# Altium PCB NB3000XN.PcbDoc (part 55 of 71)
Units mil, origin at the board's own origin, x right, y up, seen from the top; angles counter-clockwise.
Board outline 9527.56 x 6929.77 mil, 6 copper layers (Top Layer, GND+SHIELD, MidLayer1, MidLayer2, P2 - 3V3+5V0, Bottom Layer), stack 62.375 mil thick; 832 components, 1027 nets, 4655 pads, 4981 vias.
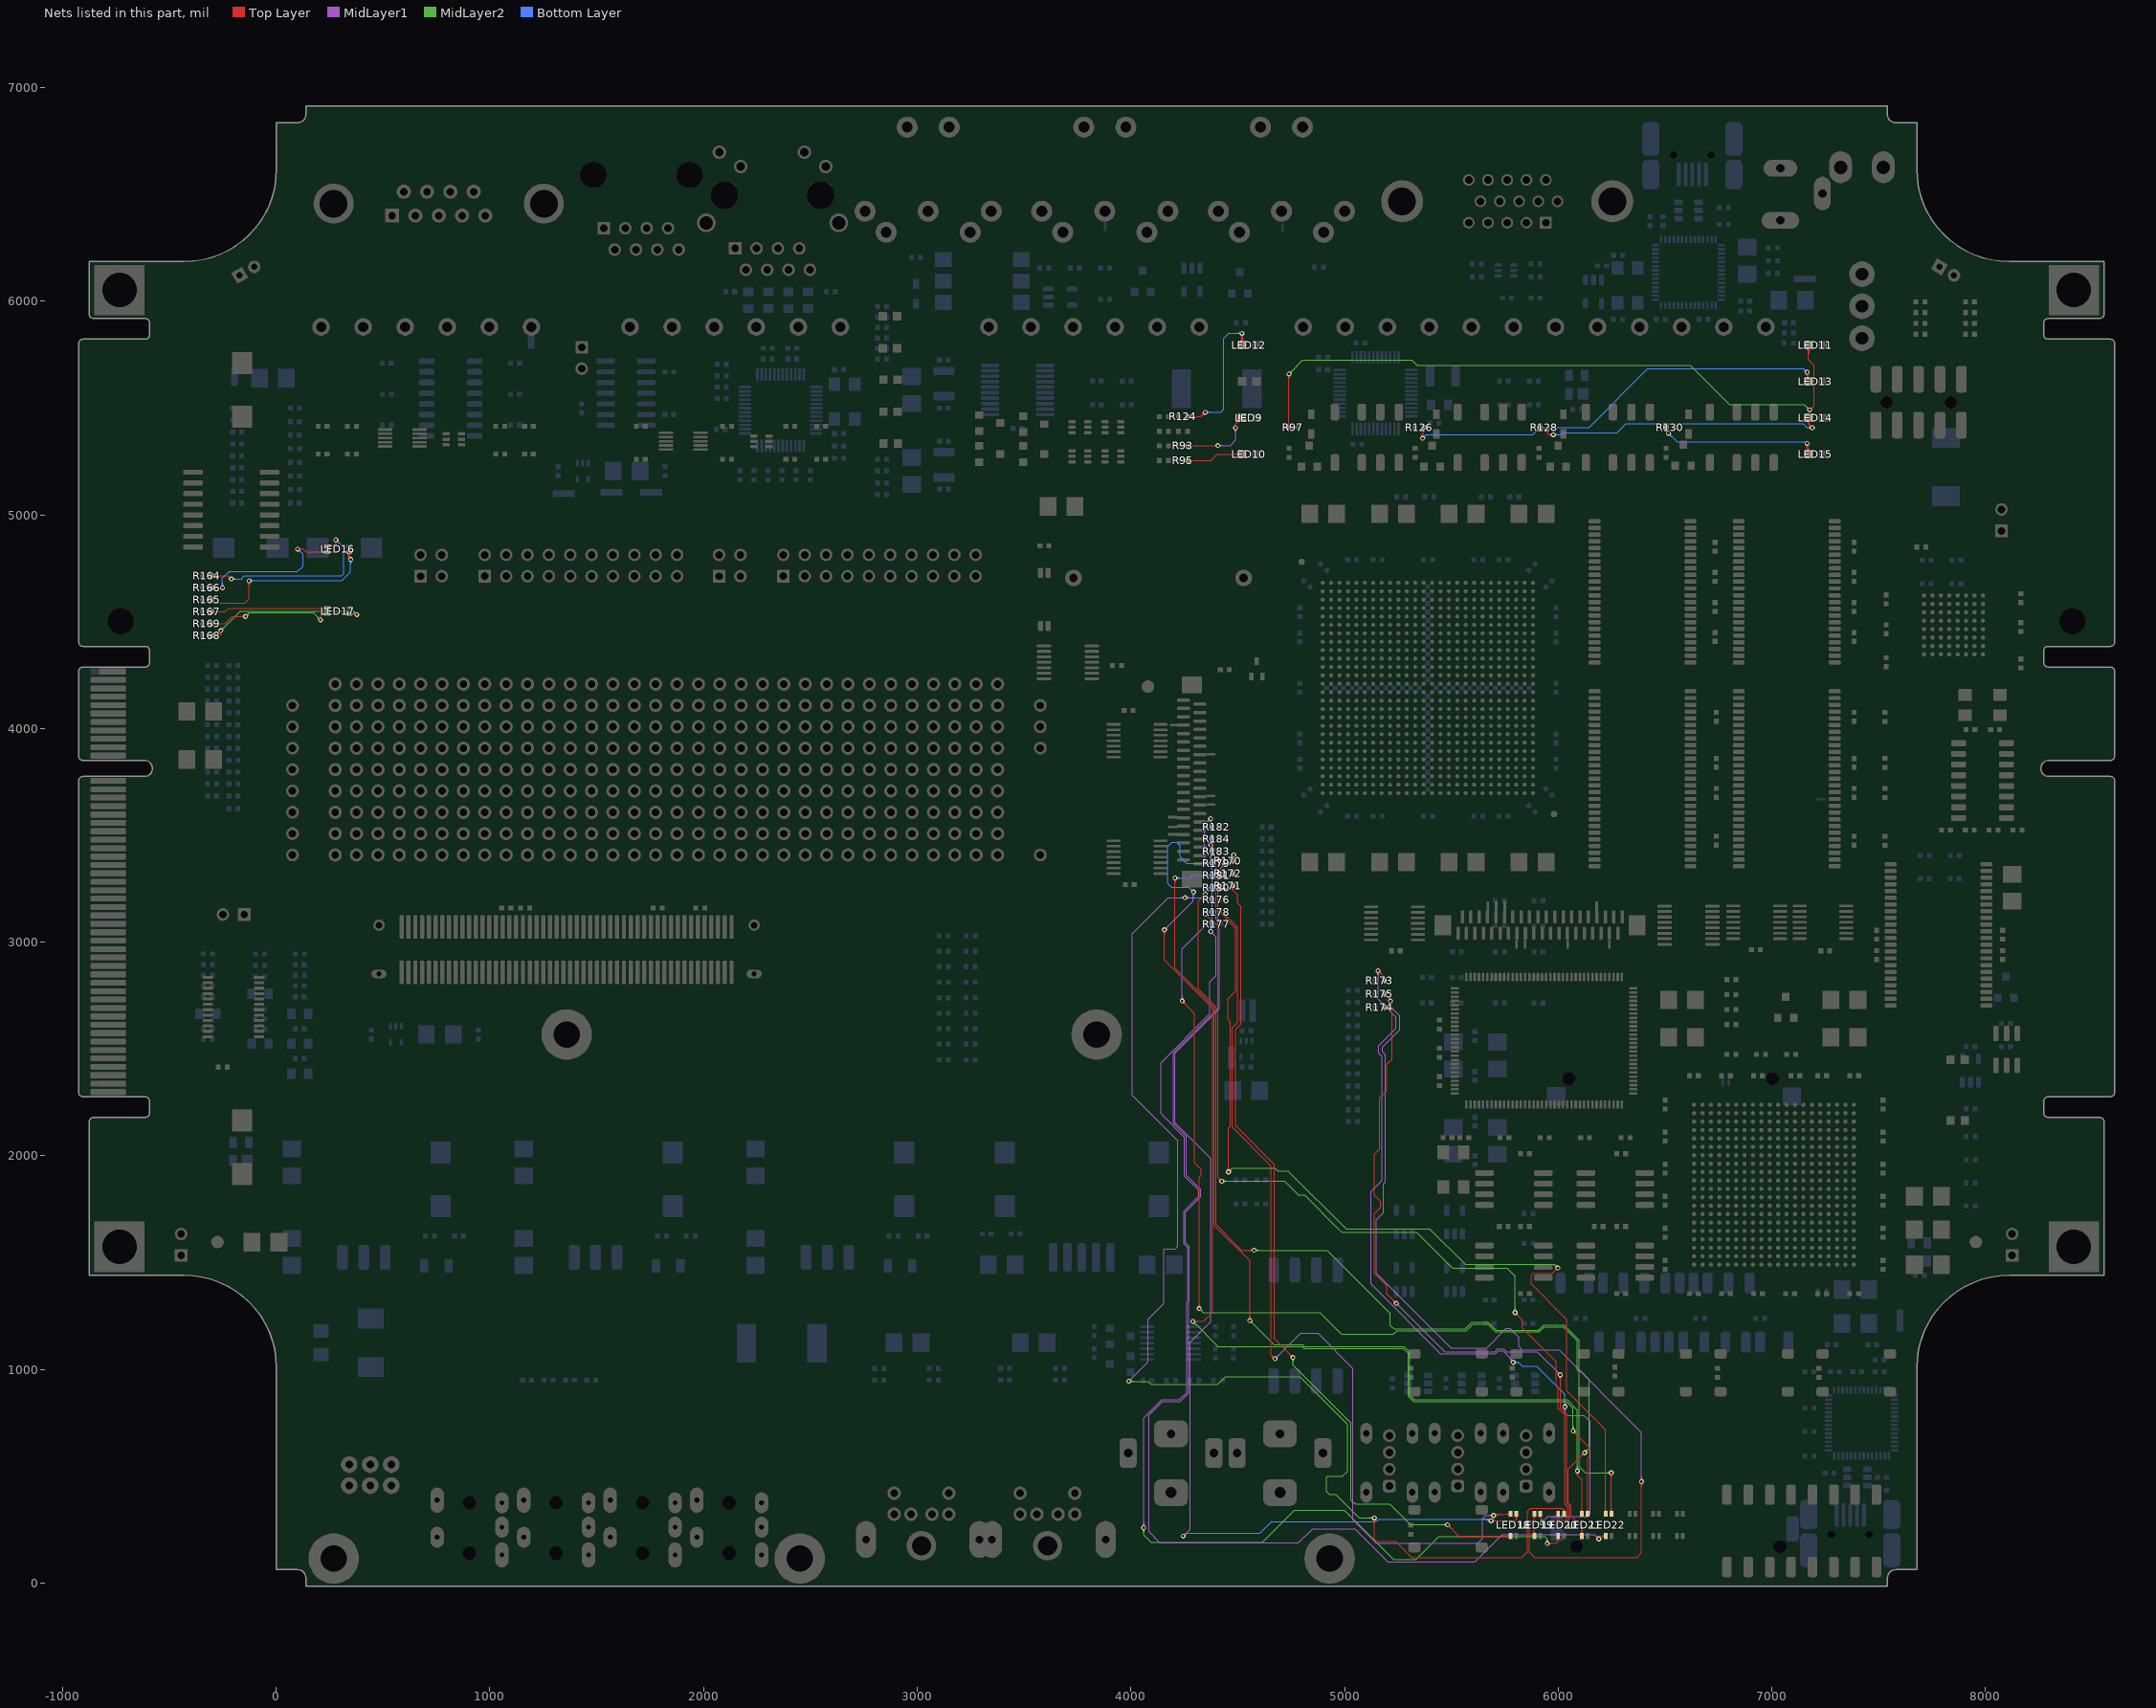
[diagram p59: the nets of this part, all layers, seen from the top]

## Via types
v1: diameter 23, hole 11.81, Top Layer to Bottom Layer, 3672 vias
v2: diameter 26, hole 11.81, Top Layer to Bottom Layer, 461 vias
v3: diameter 19, hole 11.81, Top Layer to Bottom Layer, tented both sides, 396 vias
v4: diameter 23.62, hole 11.81, Top Layer to Bottom Layer, 288 vias
v5: diameter 20, hole 11.81, Top Layer to Bottom Layer, 91 vias
v6: diameter 23, hole 11.81, Top Layer to Bottom Layer, tented both sides, 50 vias
v7: diameter 31, hole 11.81, Top Layer to Bottom Layer, 15 vias
v8: diameter 27.56, hole 11.81, Top Layer to Bottom Layer, tented both sides, 4 vias
v9: diameter 29, hole 11.81, Top Layer to Bottom Layer, 3 vias
v10: diameter 21, hole 11.81, Top Layer to Bottom Layer, 1 vias

## Nets (pads, with @x,y where several pads share a name; then routed paths per layer and width w, separated by ;. In a path a pad name is that pad's centre, name@x,y a point inside that pad or via, vN(x,y) a via of type N, cw(c..) or ccw(c..) an arc to the next point about the centre after c; other vN are vias at no path point) (continued)
NetLED9_2: LED9.2 R93.2 | length 677
  Top Layer w4: R93.2@4266.18,5323.33 4390.86,5323.33 4392.57,5325.04 v1(4406.86,5325.04) ; R93.2@4269.94,5319.57 cw(c4279.02,5310.49) 4279.02,5323.33 cw(c4279.02,5336.18) R93.2@4269.94,5327.09 ; R93.2@4272.77,5316.74 cw(c4288.68,5300.84) 4288.68,5323.33 cw(c4288.68,5345.83) R93.2@4272.77,5329.92 ; v1(4490.19,5408.37) 4490.19,5424.22 LED9.2@4520.49,5454.52 ; LED9.2@4502.8,5454.52 cw(c4460.1,5454.52) 4490.29,5424.33 cw(c4520.49,5394.14) LED9.2@4520.49,5436.83 ; LED9.2@4506.8,5454.52 cw(c4473.76,5454.52) 4497.12,5431.15 cw(c4520.49,5407.79) LED9.2@4520.49,5440.83 ; LED9.2@4510.8,5454.52 cw(c4487.42,5454.52) 4503.95,5437.98 cw(c4520.49,5421.45) LED9.2@4520.49,5444.83
  MidLayer1 w4: v1(4406.86,5325.04) 4465.04,5325.04 4490.19,5350.19 v1(4490.19,5408.37) ; v1@4410.75,5321.15 cw(c4420.14,5311.76) 4420.14,5325.04 cw(c4420.14,5338.32) v1@4410.75,5328.93 ; v1@4413.57,5318.32 cw(c4429.79,5302.11) 4429.79,5325.04 cw(c4429.79,5347.98) v1@4413.57,5331.76 ; v1@4483.47,5401.66 cw(c4467.26,5385.44) 4490.19,5385.44 cw(c4513.13,5385.44) v1@4496.91,5401.66 ; v1@4486.3,5404.49 cw(c4476.91,5395.1) 4490.19,5395.1 cw(c4503.47,5395.1) v1@4494.08,5404.49
NetLED10_2: LED10.2 R95.2 | length 477.6
  Top Layer w4: R95.2@4266.18,5255 4373.52,5255 4402.65,5284.13 LED10.2@4520.49,5284.13 ; R95.2@4269.94,5251.24 cw(c4279.02,5242.16) 4279.02,5255 cw(c4279.02,5267.84) R95.2@4269.94,5258.76 ; R95.2@4272.77,5248.41 cw(c4288.68,5232.5) 4288.68,5255 cw(c4288.68,5277.5) R95.2@4272.77,5261.59 ; LED10.2@4507.98,5271.63 ccw(c4477.79,5241.44) 4477.79,5284.13 ccw(c4477.79,5326.83) LED10.2@4507.98,5296.64 ; LED10.2@4510.81,5274.45 ccw(c4487.45,5251.09) 4487.45,5284.13 ccw(c4487.45,5317.17) LED10.2@4510.81,5293.81 ; LED10.2@4513.64,5277.28 ccw(c4497.1,5260.75) 4497.1,5284.13 ccw(c4497.1,5307.51) LED10.2@4513.64,5290.98
NetLED11_2: LED11.2 R97.2 | length 3566.2
  Top Layer w4: R97.2@4732.23,5417.08 ccw(c4713.01,5436.3) 4740.19,5436.3 ; v1@4733.47,5652.66 cw(c4717.26,5636.44) 4740.19,5636.44 cw(c4763.13,5636.44) v1@4746.91,5652.66 ; R97.2@4735.06,5414.25 ccw(c4722.67,5426.64) 4740.19,5426.64 ; v1@4736.3,5655.49 cw(c4726.91,5646.1) 4740.19,5646.1 cw(c4753.47,5646.1) v1@4744.08,5655.49 ; R97.2@4738.82,5410 4740.19,5411.37 v1(4740.19,5659.37) ; 4740.19,5429.68 ccw(c4758.01,5429.68) R97.2@4745.41,5417.08 ; LED11.2@7159.69,5782.78 cw(c7129.5,5752.59) 7172.19,5752.59 cw(c7214.89,5752.59) LED11.2@7184.7,5782.78 ; LED11.2@7162.52,5785.61 cw(c7139.15,5762.25) 7172.19,5762.25 cw(c7205.23,5762.25) LED11.2@7181.87,5785.61 ; LED11.2@7165.34,5788.44 cw(c7148.81,5771.9) 7172.19,5771.9 cw(c7195.57,5771.9) LED11.2@7179.04,5788.44 ; LED11.2@7172.19,5795.28 7172.19,5726.33 7198.52,5700 7198.52,5513.37 v1(7176.86,5491.71) ; v1@7176.86,5497.21 ccw(c7176.86,5510.49) 7186.25,5501.1 ccw(c7195.64,5491.71) v1@7182.36,5491.71 ; v1@7176.86,5501.21 ccw(c7176.86,5524.14) 7193.07,5507.93 ccw(c7209.29,5491.71) v1@7186.36,5491.71
  MidLayer2 w4: v1(4740.19,5659.37) 4775.41,5694.59 ; v1@4740.19,5664.87 ccw(c4740.19,5678.15) 4749.58,5668.76 ccw(c4758.97,5659.37) v1@4745.69,5659.37 ; v1@4740.19,5668.87 ccw(c4740.19,5691.81) 4756.41,5675.59 ccw(c4772.63,5659.37) v1@4749.69,5659.37 ; 4775,5695 4804.71,5724.71 4875,5724.71 5315.52,5724.71 5340.19,5700.04 6617.58,5700.04 6784.87,5532.75 6800.58,5517.04 7151.52,5517.04 v1(7176.86,5491.71) ; v1@7167.36,5491.71 ccw(c7144.42,5491.71) 7160.64,5507.93 ccw(c7176.86,5524.14) v1@7176.86,5501.21 ; v1@7171.36,5491.71 ccw(c7158.08,5491.71) 7167.47,5501.1 ccw(c7176.86,5510.49) v1@7176.86,5497.21
NetLED12_2: LED12.2 R124.2 | length 1107.1
  Top Layer w4: R124.2@4266.18,5460 4328.15,5460 v1(4348.52,5480.37) ; R124.2@4269.94,5456.24 cw(c4279.02,5447.16) 4279.02,5460 cw(c4279.02,5472.84) R124.2@4269.94,5463.76 ; R124.2@4272.77,5453.41 cw(c4288.68,5437.5) 4288.68,5460 cw(c4288.68,5482.5) R124.2@4272.77,5466.59 ; v1@4339.02,5480.37 cw(c4316.09,5480.37) 4332.31,5464.16 cw(c4348.52,5447.94) v1@4348.52,5470.87 ; v1@4343.02,5480.37 cw(c4329.75,5480.37) 4339.14,5470.99 cw(c4348.52,5461.6) v1@4348.52,5474.87 ; LED12.2@4507.98,5807.8 ccw(c4476.82,5838.96) v1@4520.89,5838.96 ; LED12.2@4510.81,5804.97 ccw(c4486.47,5829.3) 4520.89,5829.3 ; v1@4513.28,5843.28 cw(c4494.92,5824.92) 4520.89,5824.92 ; LED12.2@4513.64,5802.14 ccw(c4496.13,5819.65) 4520.89,5819.65 ; v1@4516.11,5846.11 cw(c4504.58,5834.58) 4520.89,5834.58 ; v1(4520,5850) 4520.89,5849.11 4520.89,5789.18 4520.49,5789.18 LED12.2@4520.49,5795.29 ; 4520.89,5817.7 ccw(c4542.89,5817.7) LED12.2@4527.33,5802.14 ; 4520.89,5827.35 ccw(c4552.55,5827.35) LED12.2@4530.16,5804.97 ; 4520.89,5829.21 cw(c4540.79,5829.21) v1@4526.72,5843.28 ; 4520.89,5837.01 ccw(c4562.21,5837.01) LED12.2@4532.99,5807.8
  Bottom Layer w4: v1(4348.52,5480.37) 4420.41,5480.37 4435.04,5495 4435.04,5825.04 4460,5850 v1(4520,5850) ; v1@4352.41,5476.49 cw(c4361.8,5467.1) 4361.8,5480.37 cw(c4361.8,5493.65) v1@4352.41,5484.26 ; v1@4355.24,5473.66 cw(c4371.46,5457.44) 4371.46,5480.37 cw(c4371.46,5503.31) v1@4355.24,5487.09 ; v1@4513.28,5843.28 ccw(c4497.06,5827.06) 4497.06,5850 ccw(c4497.06,5872.93) v1@4513.28,5856.72 ; v1@4516.11,5846.11 ccw(c4506.72,5836.72) 4506.72,5850 ccw(c4506.72,5863.28) v1@4516.11,5853.89
NetLED13_2: LED13.2 R126.2 | length 2359.2
  Top Layer w4: v1@5358.47,5365.09 ccw(c5342.26,5381.31) 5365.19,5381.31 ccw(c5388.13,5381.31) v1@5371.91,5365.09 ; v1@5361.3,5362.26 ccw(c5351.91,5371.65) 5365.19,5371.65 ccw(c5378.47,5371.65) v1@5369.08,5362.26 ; R126.2@5364.98,5402.56 cw(c5352.61,5388.7) 5371.18,5388.7 ; v1(5365.19,5358.37) 5365.19,5382.71 5371.18,5388.7 ; R126.2@5367.64,5405.54 cw(c5360.58,5397.63) 5371.18,5397.63 cw(c5381.78,5397.63) R126.2@5374.72,5405.54 ; R126.2@5371.18,5410 5371.18,5388.7 ; R126.2@5377.39,5402.56 ccw(c5389.76,5388.7) 5371.18,5388.7 ; v1@7160.64,5659.37 cw(c7156.47,5651.71) 7165.19,5651.71 ; v1(7165.19,5667.71) 7165.19,5651.71 ; 7165.44,5651.46 cw(c7152.53,5638.55) LED13.2@7167.52,5628.14 ; 7168.82,5648.08 cw(c7156.52,5635.78) LED13.2@7170.81,5625.86 ; v1@7169.74,5659.37 ccw(c7173.91,5651.71) 7165.19,5651.71 ; LED13.2@7170.2,5642.47 ccw(c7169.94,5644.71) 7172.19,5644.71 ; LED13.2@7172.19,5624.9 7172.19,5644.71 ; 7172.21,5644.69 cw(c7160.52,5633.01) LED13.2@7174.09,5623.58 ; LED13.2@7174.19,5642.47 cw(c7174.44,5644.71) 7172.19,5644.71 ; 7165.19,5651.71 7172.19,5644.71
  Bottom Layer w4: v1(5365.19,5358.37) 5381.86,5375.04 5881.86,5375.04 5916.19,5409.37 6144.37,5409.37 6419.04,5684.04 6825,5684.04 7148.86,5684.04 v1(7165.19,5667.71) ; v1@5365.19,5363.87 ccw(c5365.19,5377.15) 5374.58,5367.76 ccw(c5383.97,5358.37) v1@5370.69,5358.37 ; v1@5365.19,5367.87 ccw(c5365.19,5390.81) 5381.41,5374.59 ccw(c5397.63,5358.37) v1@5374.69,5358.37 ; v1@7155.69,5667.71 ccw(c7132.76,5667.71) 7148.97,5683.93 ccw(c7165.19,5700.14) v1@7165.19,5677.21 ; v1@7159.69,5667.71 ccw(c7146.41,5667.71) 7155.8,5677.1 ccw(c7165.19,5686.49) v1@7165.19,5673.21
NetLED14_2: LED14.2 R128.2 | length 1728.7
  Top Layer w4: R128.2@5913.82,5400.19 cw(c5913.82,5357) 5944.36,5387.54 ; R128.2@5913.82,5404.19 cw(c5913.82,5370.65) 5937.53,5394.37 ; R128.2@5913.82,5408.19 cw(c5913.82,5384.31) 5930.7,5401.19 ; R128.2@5913.82,5410 5921.9,5410 5956.86,5375.04 ; v1@5969.9,5368.95 ccw(c5956.86,5358.03) 5956.86,5375.04 ; v1@5969.9,5381.14 cw(c5956.86,5392.05) 5956.86,5375.04 ; v1@5972.97,5371.51 ccw(c5965.42,5365.19) 5965.42,5375.04 ccw(c5965.42,5384.89) v1@5972.97,5378.57 ; v1(5977.19,5375.04) 5956.86,5375.04 ; LED14.2@7163.87,5438.91 cw(c7156.48,5425.04) 7172.19,5425.04 ; LED14.2@7165.75,5442.44 cw(c7160.03,5431.71) 7172.19,5431.71 cw(c7184.35,5431.71) LED14.2@7178.63,5442.44 ; LED14.2@7172.19,5454.51 7172.19,5425.04 ; v1@7179.36,5408.37 ccw(c7156.42,5408.37) 7172.64,5424.59 ccw(c7188.86,5440.81) v1@7188.86,5417.87 ; LED14.2@7180.51,5438.91 ccw(c7187.91,5425.04) 7172.19,5425.04 ; v1@7183.36,5408.37 ccw(c7170.08,5408.37) 7179.47,5417.76 ccw(c7188.86,5427.15) v1@7188.86,5413.87 ; v1(7188.86,5408.37) 7172.19,5425.04
  Bottom Layer w4: v1(5977.19,5375.04) 6010,5375.04 6020.33,5385.37 6275.52,5385.37 6317.15,5427 7146.37,5427 7165,5408.37 v1(7188.86,5408.37) ; v1@5981.08,5371.15 cw(c5990.47,5361.76) 5990.47,5375.04 cw(c5990.47,5388.32) v1@5981.08,5378.93 ; v1@5983.91,5368.32 cw(c6000.13,5352.11) 6000.13,5375.04 cw(c6000.13,5397.98) v1@5983.91,5381.76 ; v1@7182.14,5401.66 ccw(c7165.92,5385.44) 7165.92,5408.37 ccw(c7165.92,5431.31) v1@7182.14,5415.09 ; v1@7184.97,5404.49 ccw(c7175.58,5395.1) 7175.58,5408.37 ccw(c7175.58,5421.65) v1@7184.97,5412.26
NetLED15_2: LED15.2 R130.2 | length 1035.5
  Top Layer w4: R130.2@6499.48,5401.26 cw(c6495.71,5394.08) 6503.82,5394.08 ; R130.2@6503.82,5410 6503.82,5394.08 ; R130.2@6508.16,5401.26 ccw(c6511.93,5394.08) 6503.82,5394.08 ; v1(6515.86,5382.04) 6503.82,5394.08 ; v1@7158.47,5327.99 cw(c7142.26,5311.77) 7165.19,5311.77 cw(c7188.13,5311.77) v1@7171.91,5327.99 ; LED15.2@7159.69,5296.63 ccw(c7146.4,5309.91) 7165.19,5309.91 ; v1@7161.3,5330.82 cw(c7151.91,5321.43) 7165.19,5321.43 cw(c7178.47,5321.43) v1@7169.08,5330.82 ; 7165.19,5310.12 ccw(c7192.48,5310.12) LED15.2@7175.69,5288.61 ; 7165.19,5318.31 ccw(c7198.87,5318.31) LED15.2@7178.15,5291.76 ; v1@7165.19,5326.51 ccw(c7205.27,5326.51) LED15.2@7180.61,5294.91 ; LED15.2@7172.19,5284.12 7165.19,5291.13 v1(7165.19,5334.71) ccw(c7211.66,5334.71) LED15.2@7183.07,5298.07
  Bottom Layer w4: v1@6515.86,5372.54 cw(c6515.86,5349.61) 6532.07,5365.82 cw(c6548.29,5382.04) v1@6525.36,5382.04 ; v1@6515.86,5376.54 cw(c6515.86,5363.26) 6525.25,5372.65 cw(c6534.64,5382.04) v1@6521.36,5382.04 ; v1(6515.86,5382.04) 6556.52,5341.37 7158.63,5341.37 v1@7165,5335 ; v1@7164.95,5334.95 v1(7165.19,5334.71)
NetLED16_1: LED16.1 R164.1 | length 1124.1
  Top Layer w4: R164.1@-303.82,4715 -224.77,4715 v1(-209.81,4700.04) ; R164.1@-300.06,4711.24 cw(c-290.98,4702.16) -290.98,4715 cw(c-290.98,4727.84) R164.1@-300.06,4718.76 ; R164.1@-297.23,4708.41 cw(c-281.32,4692.5) -281.32,4715 cw(c-281.32,4737.5) R164.1@-297.23,4721.59 ; LED16.1@241.49,4853.78 270.86,4853.78 278.86,4861.78 ; LED16.1@248.38,4848.75 cw(c260.52,4836.61) 260.52,4853.78 ; LED16.1@248.38,4858.45 ccw(c259.66,4869.73) 259.66,4853.78 ; v1@272.21,4877.59 cw(c256.74,4861.78) 278.86,4861.78 ; v1@275.01,4880.44 cw(c266.05,4871.29) 278.86,4871.29 cw(c291.66,4871.29) v1@282.7,4880.44 ; v1(278.86,4884.37) 278.86,4861.78 ; v1@285.5,4877.59 ccw(c300.98,4861.78) 278.86,4861.78
  Bottom Layer w4: v1(-209.81,4700.04) -164,4700.04 -150,4714.04 304.19,4714.04 315.19,4725.04 315.19,4848.04 v1(278.86,4884.37) ; v1@-205.92,4696.15 cw(c-196.53,4686.76) -196.53,4700.04 cw(c-196.53,4713.32) v1@-205.92,4703.93 ; v1@-203.09,4693.32 cw(c-186.87,4677.11) -186.87,4700.04 cw(c-186.87,4722.98) v1@-203.09,4706.76 ; v1@278.86,4874.87 cw(c278.86,4851.94) 295.07,4868.16 cw(c311.29,4884.37) v1@288.36,4884.37 ; v1@278.86,4878.87 cw(c278.86,4865.6) 288.25,4874.99 cw(c297.64,4884.37) v1@284.36,4884.37
NetLED16_3: LED16.3 R165.1 | length 1255.6
  Top Layer w4: R165.1@-303.82,4603 -287.69,4586.87 -148.13,4586.87 -126.48,4608.52 v1(-126.48,4691.71) ; R165.1@-303.73,4597.19 cw(c-303.51,4583.91) R165.1@-294.12,4593.3 ; R165.1@-303.66,4593.19 cw(c-303.29,4570.78) -287.45,4586.63 ; R165.1@-298.5,4602.51 ccw(c-286.85,4602.51) R165.1@-295.09,4594.27 ; R165.1@-294.5,4602.51 ccw(c-273.19,4602.51) -288.26,4587.44 ; v1@-133.19,4684.99 cw(c-149.41,4668.77) -126.48,4668.77 cw(c-103.54,4668.77) v1@-119.76,4684.99 ; v1@-130.36,4687.82 cw(c-139.75,4678.43) -126.48,4678.43 cw(c-113.2,4678.43) v1@-122.59,4687.82 ; LED16.3@332.24,4821.55 cw(c315.61,4804.92) 339.13,4804.92 ; LED16.3@333.47,4820.56 cw(c319.81,4806.91) 339.13,4806.91 cw(c358.44,4806.91) LED16.3@344.79,4820.56 ; LED16.3@335.07,4824.38 cw(c325.26,4814.57) 339.13,4814.57 ; 339.13,4804.3 ccw(c356.58,4804.3) v1@347.18,4789.6 ; 339.13,4811.61 ccw(c361.25,4811.61) v1@349.33,4792.97 ; 339.13,4814.77 cw(c348.72,4814.77) LED16.3@341.94,4821.55 ; LED16.3@339.13,4818.91 ccw(c365.92,4818.91) v1@351.49,4796.34 ; v1(348.52,4791.71) 339.13,4801.1 339.13,4826.22 ccw(c370.59,4826.22) v1@353.64,4799.71
  Bottom Layer w4: v1(-126.48,4691.71) 306.86,4691.71 348.52,4733.37 v1(348.52,4791.71) ; v1@-122.59,4687.82 cw(c-113.2,4678.43) -113.2,4691.71 cw(c-113.2,4704.99) v1@-122.59,4695.6 ; v1@-119.76,4684.99 cw(c-103.54,4668.77) -103.54,4691.71 cw(c-103.54,4714.64) v1@-119.76,4698.43 ; v1@341.81,4784.99 cw(c325.59,4768.77) 348.52,4768.77 cw(c371.46,4768.77) v1@355.24,4784.99 ; v1@344.64,4787.82 cw(c335.25,4778.43) 348.52,4778.43 cw(c361.8,4778.43) v1@352.41,4787.82
NetLED16_4: LED16.4 R166.1 | length 986.6
  Top Layer w4: R166.1@-303.82,4659 -267.48,4659 ; R166.1@-300.06,4655.24 cw(c-290.98,4646.16) -290.98,4659 cw(c-290.98,4671.84) R166.1@-300.06,4662.76 ; R166.1@-297.23,4652.41 cw(c-281.32,4636.5) -281.32,4659 cw(c-281.32,4681.5) R166.1@-297.23,4665.59 ; -266.85,4658.37 v1(-251.48,4658.37) ; v1(100,4840) 100.12,4840.12 125.12,4840.12 139.01,4826.22 LED16.4@241.49,4826.22 ; v1@103.89,4836.11 cw(c113.56,4826.44) 113.56,4840.12 ; v1@103.89,4843.89 ccw(c113,4853) 113,4840.12 ; v1@106.72,4833.28 cw(c123.21,4816.79) 123.21,4840.12 ; v1@106.72,4846.72 ccw(c122.66,4862.66) 122.66,4840.12 ; 216.46,4826.22 ccw(c216.46,4843.73) LED16.4@228.84,4831.35 ; 217.81,4826.22 cw(c217.81,4810.62) LED16.4@228.84,4821.65
  Bottom Layer w4: v1@-258.19,4665.09 ccw(c-274.41,4681.31) -251.48,4681.31 ccw(c-228.54,4681.31) v1@-244.76,4665.09 ; v1@-255.36,4662.26 ccw(c-264.75,4671.65) -251.48,4671.65 ccw(c-238.2,4671.65) v1@-247.59,4662.26 ; v1(-251.48,4658.37) -251.48,4703.52 -220,4735 100,4735 125,4760 125,4815 v1(100,4840) ; v1@100,4830.5 cw(c100,4807.56) 116.22,4823.78 cw(c132.43,4840) v1@109.5,4840 ; v1@100,4834.5 cw(c100,4821.22) 109.39,4830.61 cw(c118.78,4840) v1@105.5,4840
NetLED17_1: LED17.1 R167.1 | length 633.8
  Top Layer w4: R167.1@-303.82,4547 -240,4547 -223.22,4563.78 LED17.1@241.49,4563.78 ; R167.1@-300.06,4543.24 cw(c-290.98,4534.16) -290.98,4547 cw(c-290.98,4559.84) R167.1@-300.06,4550.76 ; R167.1@-297.23,4540.41 cw(c-281.32,4524.5) -281.32,4547 cw(c-281.32,4569.5) R167.1@-297.23,4553.59 ; 216.7,4563.78 cw(c216.7,4546.61) LED17.1@228.84,4558.75 ; 217.56,4563.78 ccw(c217.56,4579.73) LED17.1@228.84,4568.45
NetLED17_3: LED17.3 R168.1 | length 1004
  Top Layer w4: R168.1@-303.82,4435 -265,4435 -259.81,4440.19 ; R168.1@-300.06,4431.24 cw(c-290.98,4422.16) -290.98,4435 cw(c-290.98,4447.84) R168.1@-300.06,4438.76 ; R168.1@-297.23,4428.41 cw(c-281.32,4412.5) -281.32,4435 cw(c-281.32,4457.5) R168.1@-297.23,4441.59 ; v1@-265.24,4450.58 cw(c-272.46,4440.19) -259.81,4440.19 ; v1(-259.81,4458.37) -259.81,4440.19 ; v1@-254.38,4450.58 ccw(c-247.16,4440.19) -259.81,4440.19 ; LED17.3@339.13,4536.22 363.01,4536.22 ; LED17.3@351.79,4531.56 cw(c363.01,4520.38) 363.01,4536.22 ; LED17.3@351.97,4541.05 ccw(c363.01,4551.25) 363.01,4536.22 ; v1(377.19,4533.37) 365.86,4533.37 363.01,4536.22
  MidLayer2 w4: v1(-259.81,4458.37) -168.14,4550.04 -80,4550.04 -50.04,4550 -50,4550.04 360.52,4550.04 v1(377.19,4533.37) ; v1@-259.81,4463.87 ccw(c-259.81,4477.15) -250.42,4467.76 ccw(c-241.03,4458.37) v1@-254.31,4458.37 ; v1@-259.81,4467.87 ccw(c-259.81,4490.81) -243.59,4474.59 ccw(c-227.37,4458.37) v1@-250.31,4458.37 ; v1@367.69,4533.37 ccw(c344.76,4533.37) 360.97,4549.59 ccw(c377.19,4565.81) v1@377.19,4542.87 ; v1@371.69,4533.37 ccw(c358.41,4533.37) 367.8,4542.76 ccw(c377.19,4552.15) v1@377.19,4538.87
NetLED17_4: LED17.4 R169.1 | length 884
  Top Layer w4: R169.1@-303.82,4491 -239,4491 -204.96,4525.04 v1(-143.14,4525.04) ; R169.1@-300.06,4487.24 cw(c-290.98,4478.16) -290.98,4491 cw(c-290.98,4503.84) R169.1@-300.06,4494.76 ; R169.1@-297.23,4484.41 cw(c-281.32,4468.5) -281.32,4491 cw(c-281.32,4513.5) R169.1@-297.23,4497.59 ; v1@-149.86,4518.32 ccw(c-166.08,4502.11) -166.08,4525.04 ccw(c-166.08,4547.98) v1@-149.86,4531.76 ; v1@-147.03,4521.15 ccw(c-156.42,4511.76) -156.42,4525.04 ccw(c-156.42,4538.32) v1@-147.03,4528.93 ; v1@200.9,4515.77 ccw(c190.88,4528.22) 206.86,4528.22 ; v1(206.86,4508.37) 206.86,4528.22 ; v1@212.81,4515.77 cw(c222.83,4528.22) 206.86,4528.22 ; 216.46,4536.22 ccw(c216.46,4553.73) LED17.4@228.84,4541.35 ; 217.81,4536.22 cw(c217.81,4520.62) LED17.4@228.84,4531.65 ; LED17.4@241.49,4536.22 214.86,4536.22 206.86,4528.22
  MidLayer2 w4: v1(-143.14,4525.04) -126.48,4541.71 173.52,4541.71 v1(206.86,4508.37) ; v1@-143.14,4530.54 ccw(c-143.14,4543.82) -133.75,4534.43 ccw(c-124.36,4525.04) v1@-137.64,4525.04 ; v1@-143.14,4534.54 ccw(c-143.14,4557.48) -126.93,4541.26 ccw(c-110.71,4525.04) v1@-133.64,4525.04 ; v1@197.36,4508.37 ccw(c174.42,4508.37) 190.64,4524.59 ccw(c206.86,4540.81) v1@206.86,4517.87 ; v1@201.36,4508.37 ccw(c188.08,4508.37) 197.47,4517.76 ccw(c206.86,4527.15) v1@206.86,4513.87
NetLED18_1: LED18.1 R170.1 | length 5504.3
  Top Layer w4: R170.1@4471.04,3388.27 ccw(c4457.76,3408.37) v1(4481.86,3408.37) R170.1@4481.86,3383.37 ; R170.1@4473.25,3384.93 ccw(c4462.67,3400.94) v1@4481.86,3400.94 ; v1@4475.14,3401.66 cw(c4458.92,3385.44) 4481.86,3385.44 cw(c4504.79,3385.44) v1@4488.57,3401.66 ; R170.1@4475.45,3381.59 ccw(c4467.59,3393.5) 4481.86,3393.5 ; v1@4477.97,3404.49 cw(c4468.58,3395.1) 4481.86,3395.1 cw(c4495.14,3395.1) v1@4485.75,3404.49 ; v1(5686.19,291.71) 5797.44,291.71 5804.73,299 LED18.1@5804.73,321.33 ; v1@5690.08,287.82 cw(c5699.47,278.43) 5699.47,291.71 cw(c5699.47,304.99) v1@5690.08,295.6 ; v1@5692.91,284.99 cw(c5709.13,268.77) 5709.13,291.71 cw(c5709.13,314.64) v1@5692.91,298.43 ; LED18.1@5799.71,314.44 cw(c5787.56,302.3) 5804.73,302.3 ; 5804.73,303.16 cw(c5820.68,303.16) LED18.1@5809.4,314.44
  MidLayer1 w4: v1(4245,220) 4278,253 4278,1128 4373.52,1223.52 4373.52,1987.73 4206.86,2154.4 4206.86,2480.39 4415,2688.54 4415,2730 ; v1@4245,225.5 ccw(c4245,238.78) 4254.39,229.39 ccw(c4263.78,220) v1@4250.5,220 ; v1@4245,229.5 ccw(c4245,252.43) 4261.22,236.22 ccw(c4277.43,220) v1@4254.5,220 ; 4415.19,2730 4415.19,3101.12 4406.86,3109.46 4406.86,3333.37 v1(4481.86,3408.37) ; v1@4472.36,3408.37 cw(c4449.42,3408.37) 4465.64,3392.16 cw(c4481.86,3375.94) v1@4481.86,3398.87 ; v1@4476.36,3408.37 cw(c4463.08,3408.37) 4472.47,3398.99 cw(c4481.86,3389.6) v1@4481.86,3402.87
  Bottom Layer w4: v1(4245,220) 4258.37,233.37 4604.69,233.37 4658.5,287.19 5147.38,287.19 5160.23,300.04 5677.86,300.04 v1(5686.19,291.71) ; 5643.14,300.04 cw(c5643.14,248.66) v1@5679.47,284.99 ; 5652.79,300.04 cw(c5652.79,258.31) v1@5682.3,287.82 ; 5662.45,300.04 cw(c5662.45,267.97) v1@5685.13,290.65 ; 5672.11,300.04 cw(c5672.11,277.63) v1@5687.96,293.48
NetLED18_3: LED18.3 R171.1 | length 4246.8
  Top Layer w4: R171.1@4469.9,3257.63 cw(c4456.88,3243.38) 4476.18,3243.38 ; R171.1@4472.59,3260.58 cw(c4465.17,3252.45) 4476.18,3252.45 cw(c4487.2,3252.45) R171.1@4479.77,3260.58 ; R171.1@4476.18,3265 4476.18,3243.37 ; R171.1@4482.47,3257.63 ccw(c4495.48,3243.38) 4476.18,3243.38 ; v1@4749.36,1056.37 ccw(c4726.42,1056.37) 4742.64,1072.59 ccw(c4758.86,1088.81) v1@4758.86,1065.87 ; v1@4753.36,1056.37 ccw(c4740.08,1056.37) 4749.47,1065.76 ccw(c4758.86,1075.15) v1@4758.86,1061.87 ; v1(4758.86,1056.37) 4672.71,1142.52 4672.71,1959.18 4490.19,2141.71 4490.19,2591.71 4515.19,2616.71 4515.19,3166.71 4498.52,3183.37 4498.52,3221.03 4476.18,3243.37 ; v1@5481.86,263.87 cw(c5481.86,240.94) 5498.07,257.16 cw(c5514.29,273.37) v1@5491.36,273.37 ; v1@5481.86,267.87 cw(c5481.86,254.6) 5491.25,263.99 cw(c5500.64,273.37) v1@5487.36,273.37 ; v1(5481.86,273.37) 5534.42,220.81 LED18.3@5777.35,220.81 ; LED18.3@5772.51,215.96 ccw(c5760.8,204.25) 5760.8,220.81 ccw(c5760.8,237.36) LED18.3@5772.51,225.66
  MidLayer2 w4: v1@4752.14,1049.66 cw(c4735.92,1033.44) 4758.86,1033.44 cw(c4781.79,1033.44) v1@4765.57,1049.66 ; v1@4754.97,1052.49 cw(c4745.58,1043.1) 4758.86,1043.1 cw(c4772.14,1043.1) v1@4762.75,1052.49 ; v1(4758.86,1056.37) 4758.86,1021.14 5030,750 5030,389.43 5049.43,370 5212.25,370 5308.88,273.37 v1(5481.86,273.37) ; v1@5475.14,266.66 ccw(c5458.92,250.44) 5458.92,273.37 ccw(c5458.92,296.31) v1@5475.14,280.09 ; v1@5477.97,269.49 ccw(c5468.58,260.1) 5468.58,273.37 ccw(c5468.58,286.65) v1@5477.97,277.26
NetLED18_4: LED18.4 R172.1 | length 4925.2
  Top Layer w4: 4459.43,3305.75 cw(c4476.18,3289) R172.1@4476.18,3312.69 ; 4460.62,3306.94 ccw(c4445.55,3322.01) R172.1@4466.86,3322.01 ; R172.1@4466.26,3312.58 cw(c4476.18,3302.66) R172.1@4476.18,3316.69 ; R172.1@4467.45,3313.77 ccw(c4459.21,3322.01) R172.1@4470.86,3322.01 ; R172.1@4476.18,3322.5 4453.72,3300.04 4416.86,3300.04 4406.86,3290.04 4406.86,3161.36 4499.19,3069.02 4499.19,2623.34 4473.86,2598 4473.86,2135.41 4656.71,1952.56 4656.71,1067.85 v1(4674.52,1050.04) ; v1@4665.02,1050.04 ccw(c4642.09,1050.04) 4658.31,1066.26 ccw(c4674.52,1082.48) v1@4674.52,1059.54 ; v1@4669.02,1050.04 ccw(c4655.75,1050.04) 4665.14,1059.43 ccw(c4674.52,1068.82) v1@4674.52,1055.54 ; v1(5697.52,316.71) 5702.14,321.33 5750,321.33 5752.88,324.21 LED18.4@5777.45,324.21 ; v1@5698.58,315.65 cw(c5712.29,301.94) 5712.29,321.33 ; v1@5701.41,312.82 cw(c5721.95,292.28) 5721.95,321.33 ; v1@5704.24,309.99 cw(c5731.61,282.62) 5731.61,321.33 ; v1@5704.24,323.43 ccw(c5709.31,328.49) 5709.31,321.33 ; LED18.4@5772.61,319.36 ccw(c5760.9,307.65) 5760.9,324.21 ccw(c5760.9,340.76) LED18.4@5772.61,329.06
  MidLayer1 w4: v1(4674.52,1050.04) 4794.48,1170 4875.58,1170 5040.19,1005.39 5040.19,297.44 5149.82,187.81 5530,187.81 ; v1@4674.52,1055.54 ccw(c4674.52,1068.82) 4683.91,1059.43 ccw(c4693.3,1050.04) v1@4680.02,1050.04 ; v1@4674.52,1059.54 ccw(c4674.52,1082.48) 4690.74,1066.26 ccw(c4706.96,1050.04) v1@4684.02,1050.04 ; 5590,187.81 5530,187.81 ; v1@5690.81,309.99 ccw(c5674.59,293.77) 5674.59,316.71 ccw(c5674.59,339.64) v1@5690.81,323.43 ; v1@5693.64,312.82 ccw(c5684.25,303.43) 5684.25,316.71 ccw(c5684.25,329.99) v1@5693.64,320.6 ; v1(5697.52,316.71) 5660,316.71 5645,301.71 5645,210 5622.81,187.81 5530,187.81
NetLED19_1: LED19.1 R173.1 | length 4150.4
  Top Layer w4: v1@5156.86,2857.21 cw(c5156.86,2834.27) 5173.07,2850.49 cw(c5189.29,2866.71) v1@5166.36,2866.71 ; v1@5156.86,2861.21 cw(c5156.86,2847.93) 5166.25,2857.32 cw(c5175.64,2866.71) v1@5162.36,2866.71 ; v1(5156.86,2866.71) 5186.18,2837.38 ; R173.1@5181.21,2828.38 ccw(c5175.53,2837.38) 5186.18,2837.38 ; R173.1@5186.18,2820 5186.18,2837.38 ; R173.1@5191.15,2828.38 cw(c5196.83,2837.38) 5186.18,2837.38 ; LED19.1@5912.51,313.27 cw(c5909.48,307.72) 5915.8,307.72 ; LED19.1@5915.8,324.21 5915.8,307.72 ; LED19.1@5919.09,313.27 ccw(c5922.12,307.72) 5915.8,307.72 ; v1(5923.52,283.37) 5923.52,300 5915.8,307.72
  MidLayer1 w4: v1@5150.14,2859.99 cw(c5133.92,2843.77) 5156.86,2843.77 cw(c5179.79,2843.77) v1@5163.57,2859.99 ; v1@5152.97,2862.82 cw(c5143.58,2853.43) 5156.86,2853.43 cw(c5170.14,2853.43) v1@5160.75,2862.82 ; v1(5156.86,2866.71) 5156.86,2734.04 5241.81,2649.09 5241.81,2595.62 5161.19,2515 5161.19,2480.04 5176.4,2464.83 5176.4,1885.16 5123.86,1832.61 5123.86,1399.71 5449.02,1074.55 5706.25,1074.55 5719.74,1088.04 5742.25,1088.04 5790.19,1040.1 v1(5790.19,1033.37) ; 5769.22,1061.07 cw(c5741.52,1033.37) v1@5780.69,1033.37 ; 5776.05,1054.24 cw(c5755.18,1033.37) v1@5784.69,1033.37 ; 5782.87,1047.41 cw(c5768.83,1033.37) v1@5788.69,1033.37 ; 5785.45,1044.84 ccw(c5790.19,1049.58) v1@5790.19,1042.87 ; v1(5923.52,283.37) 5953.19,313.04 6138.04,313.04 6148.86,323.86 6148.86,756.14 6120,785 6041.86,785 6031.86,795 v1(6031.86,826.04) ; v1@5923.52,288.87 ccw(c5923.52,302.15) 5932.91,292.76 ccw(c5942.3,283.37) v1@5929.02,283.37 ; v1@5923.52,292.87 ccw(c5923.52,315.81) 5939.74,299.59 ccw(c5955.96,283.37) v1@5933.02,283.37 ; v1@6025.14,819.32 cw(c6008.92,803.11) 6031.86,803.11 cw(c6054.79,803.11) v1@6038.57,819.32 ; v1@6027.97,822.15 cw(c6018.58,812.76) 6031.86,812.76 cw(c6045.14,812.76) v1@6035.75,822.15
  Bottom Layer w4: v1(5790.19,1033.37) 5813.97,1033.37 5832.35,1015 5900,1015 6031.86,883.14 v1(6031.86,826.04) ; v1@5794.08,1029.49 cw(c5803.47,1020.1) 5803.47,1033.37 cw(c5803.47,1046.65) v1@5794.08,1037.26 ; v1@5796.91,1026.66 cw(c5813.13,1010.44) 5813.13,1033.37 cw(c5813.13,1056.31) v1@5796.91,1040.09 ; v1@6025.14,832.76 ccw(c6008.92,848.98) 6031.86,848.98 ccw(c6054.79,848.98) v1@6038.57,832.76 ; v1@6027.97,829.93 ccw(c6018.58,839.32) 6031.86,839.32 ccw(c6045.14,839.32) v1@6035.75,829.93
NetLED19_3: LED19.3 R174.1 | length 3656.3
  Top Layer w4: R174.1@5186.18,2695 5215.86,2695 5223.86,2687 5223.86,2453.36 5198.52,2428.02 5198.52,2305 5164,2270.48 5164,2031.56 5139.86,2007.41 5139.86,1815.14 5170,1785 5170,1760 5139.86,1729.86 5139.86,1450.14 5198.52,1391.48 5198.52,1353.37 v1(5242.19,1309.71) ; R174.1@5189.94,2691.24 cw(c5199.02,2682.16) 5199.02,2695 cw(c5199.02,2707.84) R174.1@5189.94,2698.76 ; R174.1@5192.77,2688.41 cw(c5208.68,2672.5) 5208.68,2695 cw(c5208.68,2717.5) R174.1@5192.77,2701.59 ; v1@5232.69,1309.71 ccw(c5209.76,1309.71) 5225.97,1325.93 ccw(c5242.19,1342.14) v1@5242.19,1319.21 ; v1@5236.69,1309.71 ccw(c5223.41,1309.71) 5232.8,1319.1 ccw(c5242.19,1328.49) v1@5242.19,1315.21 ; LED19.3@5883.75,230.58 ccw(c5872.04,242.29) 5888.6,242.29 ccw(c5905.16,242.29) LED19.3@5893.45,230.58 ; LED19.3@5888.42,220.81 LED19.3@5888.42,223.69 ; LED19.3@5888.6,220.81 5888.6,253.6 5895,260 6009,260 6053,304 6053,359.25 6040,372.25 6040,790.19 6010.19,820 v1(6010.19,975.04) ; v1@6003.47,968.32 cw(c5987.26,952.11) 6010.19,952.11 cw(c6033.13,952.11) v1@6016.91,968.32 ; v1@6006.3,971.15 cw(c5996.91,961.76) 6010.19,961.76 cw(c6023.47,961.76) v1@6014.08,971.15
  MidLayer1 w4: v1@5242.19,1300.21 cw(c5242.19,1277.27) 5258.41,1293.49 cw(c5274.63,1309.71) v1@5251.69,1309.71 ; v1@5242.19,1304.21 cw(c5242.19,1290.93) 5251.58,1300.32 cw(c5260.97,1309.71) v1@5247.69,1309.71 ; v1(5242.19,1309.71) 5468.52,1083.37 5703.76,1083.37 5716.43,1096.04 5745.56,1096.04 5758.23,1083.37 5901.86,1083.37 v1(6010.19,975.04) ; v1@6000.69,975.04 ccw(c5977.76,975.04) 5993.97,991.26 ccw(c6010.19,1007.48) v1@6010.19,984.54 ; v1@6004.69,975.04 ccw(c5991.41,975.04) 6000.8,984.43 ccw(c6010.19,993.82) v1@6010.19,980.54
NetLED19_4: LED19.4 R175.1 | length 4682.8
  Top Layer w4: R175.1@5186.18,2747.69 cw(c5186.18,2712.21) 5211.27,2737.3 ; R175.1@5186.18,2751.69 cw(c5186.18,2725.87) 5204.44,2744.13 ; R175.1@5186.18,2755.69 cw(c5186.18,2739.53) 5197.61,2750.95 ; R175.1@5186.18,2757.5 5186.18,2750.04 5198.52,2750.04 5215.19,2733.37 v1(5215.19,2725.04) ; R175.1@5188.75,2752.35 cw(c5192.28,2745.95) R175.1@5197.45,2751.12 ; R175.1@5190.68,2748.85 cw(c5194.95,2741.09) 5201.21,2747.35 ; 5200.85,2747.71 cw(c5179.47,2726.32) v1@5209.69,2725.24 ; 5207.35,2741.21 cw(c5192.01,2725.87) v1@5213.69,2725.09 ; LED19.4@5883.85,314.44 cw(c5872.82,303.4) 5888.42,303.4 ; 5888.42,302.05 cw(c5905.93,302.05) LED19.4@5893.55,314.44 ; LED19.4@5888.42,321.33 5888.42,298.23 5865.19,275 5865.19,145 5890.19,120 6368.69,120 6390.19,141.5 v1(6390.19,475.04) ; v1@6383.47,468.32 cw(c6367.26,452.11) 6390.19,452.11 cw(c6413.13,452.11) v1@6396.91,468.32 ; v1@6386.3,471.15 cw(c6376.91,461.76) 6390.19,461.76 cw(c6403.47,461.76) v1@6394.08,471.15 ; R175.1@5195.5,2757.01 ccw(c5205.02,2757.01) 5198.29,2750.28 cw(c5205.02,2757.01) R175.1@5195.5,2757.01
  MidLayer1 w4: v1@5208.47,2718.32 cw(c5192.71,2702.56) 5215,2702.56 ; v1@5211.3,2721.15 cw(c5202.37,2712.22) 5215,2712.22 ; 5215,2701.65 cw(c5238.58,2701.65) v1@5221.91,2718.32 ; 5215,2711.3 cw(c5228.93,2711.3) v1@5219.08,2721.15 ; v1@5215,2725 5215,2698.52 5257.81,2655.71 5257.81,2588.99 5177.19,2508.37 5177.19,2486.67 5192.4,2471.45 5192.4,1878.53 5181.86,1867.98 5181.86,1733.37 5148.52,1700.04 5148.52,1450.04 5498.52,1100.04 5665.19,1100.04 5756.86,1191.71 5773.52,1191.71 5815.19,1150.04 5815.19,1108.37 5831.86,1091.71 6003.88,1091.71 6390.19,705.39 v1(6390.19,475.04) ; v1@6383.47,481.76 ccw(c6367.26,497.98) 6390.19,497.98 ccw(c6413.13,497.98) v1@6396.91,481.76 ; v1@6386.3,478.93 ccw(c6376.91,488.32) 6390.19,488.32 ccw(c6403.47,488.32) v1@6394.08,478.93
NetLED20_1: LED20.1 R176.1 | length 6175.4
  Top Layer w4: v4@5133.06,298.06 cw(c5116.31,281.31) 5140,281.31 cw(c5163.69,281.31) v4@5146.94,298.06 ; v4@5135.89,300.89 cw(c5125.97,290.97) 5140,290.97 cw(c5154.03,290.97) v4@5144.11,300.89 ; v4(5140,305) 5140,205 5150,195 5239.45,195 5314.45,120 5830,120 5857.19,147.19 5857.19,337.23 5869.96,350 6020,350 6027.05,342.95 ; LED20.1@6022.9,334.59 ccw(c6016.55,342.95) 6027.05,342.95 ; LED20.1@6027.05,324.21 6027.05,342.95 ; LED20.1@6031.2,334.59 cw(c6037.55,342.95) 6027.05,342.95
  MidLayer1 w4: v4(3990,945) 4080,1035 4080,1235.04 4155,1310.04 4155,1560 4160,1565 4208.14,1565 4220,1576.86 4220,2070 4006.86,2283.14 4006.86,3041.1 4174.13,3208.37 v1(4253.52,3208.37) ; v4@3990,950.81 ccw(c3990,964.84) 3999.92,954.92 ccw(c4009.84,945) v4@3995.81,945 ; v4@3990,954.81 ccw(c3990,978.5) 4006.75,961.75 ccw(c4023.5,945) v4@3999.81,945 ; v1@4246.81,3201.66 ccw(c4230.59,3185.44) 4230.59,3208.37 ccw(c4230.59,3231.31) v1@4246.81,3215.09 ; v1@4249.64,3204.49 ccw(c4240.25,3195.1) 4240.25,3208.37 ccw(c4240.25,3221.65) v1@4249.64,3212.26
  MidLayer2 w4: v4(3990,945) 4080,945 4095,930 4406,930 4443,967 4790.37,967 5014,743.37 5014,524 4990,500 4920,500 4915.27,495.27 4915.27,429.73 4929.19,415.81 4958.36,415.81 5069.17,305 v4(5140,305) ; v4@3994.11,940.89 cw(c4004.03,930.97) 4004.03,945 cw(c4004.03,959.03) v4@3994.11,949.11 ; v4@3996.94,938.06 cw(c4013.69,921.31) 4013.69,945 cw(c4013.69,968.69) v4@3996.94,951.94 ; v4@5133.06,298.06 ccw(c5116.31,281.31) 5116.31,305 ccw(c5116.31,328.69) v4@5133.06,311.94 ; v4@5135.89,300.89 ccw(c5125.97,290.97) 5125.97,305 ccw(c5125.97,319.03) v4@5135.89,309.11
  Bottom Layer w4: v1@4254.52,3207.37 4366.19,3207.37 4373.52,3200.04 4378.82,3200.04 R176.1@4378.82,3198.75 ; v1@4257.41,3212.26 ccw(c4269.22,3224.07) 4269.22,3207.37 ; v1@4260.24,3201.66 cw(c4274.04,3187.85) 4274.04,3207.37 ; v1@4260.24,3215.09 ccw(c4278.87,3233.72) 4278.87,3207.37
NetLED20_3: LED20.3 R177.1 | length 5887.4
  Top Layer w4: v1(5948.94,185.44) 5949.5,186 5991,186 5999.67,194.67 LED20.3@5999.67,221.19 ; v1@5952.83,181.55 cw(c5963.56,170.82) 5963.56,186 ; v1@5952.83,189.33 ccw(c5960.87,197.37) 5960.87,186 ; v1@5955.66,178.72 cw(c5973.22,161.16) 5973.22,186 ; v1@5955.66,192.16 ccw(c5970.53,207.03) 5970.53,186 ; LED20.3@5995,211.04 cw(c5983.73,199.76) 5999.67,199.76 ; 5999.67,198.9 cw(c6016.84,198.9) LED20.3@6004.7,211.04 ; LED20.3@5999.67,221.19 5999.67,223.69 LED20.3@5999.67,221.19
  MidLayer1 w4: v1@4053.28,266.72 ccw(c4037.06,282.93) 4060,282.93 ccw(c4082.93,282.93) v1@4066.72,266.72 ; v1@4056.11,263.89 ccw(c4046.72,273.28) 4060,273.28 ccw(c4073.28,273.28) v1@4063.89,263.89 ; v1(4060,260) 4060,773 4145,858 4226.69,858 4262,893.31 4262,1318.31 4265.86,1322.17 4265.86,1553.23 4266,1553.37 4266,1571.5 4248.02,1589.48 4248.02,1740.65 4318.5,1811.12 4318.5,1838.88 4252,1905.38 4252,2086.63 4140.19,2198.44 4140.19,2436.35 4370,2666.16 4370,2814.14 4398.86,2843 4398.86,3024.71 v1(4373.52,3050.04) ; v1@4373.52,3040.54 cw(c4373.52,3017.61) 4389.74,3033.82 cw(c4405.96,3050.04) v1@4383.02,3050.04 ; v1@4373.52,3044.54 cw(c4373.52,3031.26) 4382.91,3040.65 cw(c4392.3,3050.04) v1@4379.02,3050.04
  MidLayer2 w4: v1@4053.28,253.28 cw(c4037.06,237.06) 4060,237.06 cw(c4082.93,237.06) v1@4066.72,253.28 ; v1@4056.11,256.11 cw(c4046.72,246.72) 4060,246.72 cw(c4073.28,246.72) v1@4063.89,256.11 ; v1(4060,260) 4060,225 4093.29,191.71 4615.19,191.71 4765.19,341.71 4998.52,341.71 5230.23,110 5334.09,110 5441.8,217.71 5937.29,217.71 5948.94,206.06 ; v1@5942.77,192.66 ccw(c5931.31,206.06) 5948.94,206.06 ; v1@5945.37,189.62 ccw(c5938.73,197.38) 5948.94,197.38 ccw(c5959.15,197.38) v1@5952.51,189.62 ; v1(5948.94,185.44) 5948.94,206.06 ; v1@5955.11,192.66 cw(c5966.57,206.06) 5948.94,206.06
  Bottom Layer w4: v1@4366.81,3056.76 ccw(c4350.59,3072.98) 4373.52,3072.98 ccw(c4396.46,3072.98) v1@4380.24,3056.76 ; v1@4369.64,3053.93 ccw(c4360.25,3063.32) 4373.52,3063.32 ccw(c4386.8,3063.32) v1@4377.41,3053.93 ; v1@4373.52,3049.64 cw(c4413.11,3049.64) R177.1@4385.35,3077.86 ; v1(4373.52,3050.04) 4373.52,3091.71 4378.82,3091.71 R177.1@4378.82,3085 ; v1@4373.52,3059.18 cw(c4403.73,3059.18) R177.1@4382.55,3080.72 ; 4373.52,3068.73 cw(c4394.34,3068.73) R177.1@4379.74,3083.57
NetLED20_4: LED20.4 R178.1 | length 4538.9
  Top Layer w4: v1@4348.52,3122.21 cw(c4348.52,3095.25) 4367.59,3114.31 ; v1@4348.52,3126.21 cw(c4348.52,3108.91) 4360.76,3121.14 ; v1@4350.19,3131.71 4406.86,3075.04 4406.86,1900.04 v1(4425.52,1881.37) ; v1@4358.02,3131.71 ccw(c4376.94,3131.71) 4363.56,3118.33 ; v1@4416.02,1881.37 ccw(c4393.09,1881.37) 4409.31,1897.59 ccw(c4425.52,1913.81) v1@4425.52,1890.87 ; v1@4420.02,1881.37 ccw(c4406.75,1881.37) 4416.13,1890.76 ccw(c4425.52,1900.15) v1@4425.52,1886.87 ; v1@5798.52,1257.21 cw(c5798.52,1234.27) 5814.74,1250.49 cw(c5830.96,1266.71) v1@5808.02,1266.71 ; v1@5798.52,1261.21 cw(c5798.52,1247.93) 5807.91,1257.32 cw(c5817.3,1266.71) v1@5804.02,1266.71 ; v1(5798.52,1266.71) 5831.67,1233.56 5831.67,1194.88 5990.19,1036.36 5990.19,927.37 6000.86,916.71 6000.86,818.02 6032,786.88 6032,368.94 6045,355.94 6045,307.31 6030.69,293 6006,293 5999.95,299.05 LED20.4@5999.95,324.21 ; LED20.4@5995.1,314.44 cw(c5983.39,302.73) 5999.95,302.73 cw(c6016.51,302.73) LED20.4@6004.8,314.44 ; LED20.4@5999.67,324.21 LED20.4@5999.67,323.83 ; LED20.4@5999.67,323.83 5999.67,321.33 LED20.4@5999.67,323.83
  MidLayer2 w4: v1(4425.52,1881.37) 4718.86,1881.37 4783.46,1816.77 4812.15,1816.77 4967.54,1661.38 4987.21,1641.71 5337.21,1641.71 5503.88,1475.04 5759.96,1475.04 5798.52,1436.48 v1(5798.52,1266.71) ; v1@4429.41,1877.49 cw(c4438.8,1868.1) 4438.8,1881.37 cw(c4438.8,1894.65) v1@4429.41,1885.26 ; v1@4432.24,1874.66 cw(c4448.46,1858.44) 4448.46,1881.37 cw(c4448.46,1904.31) v1@4432.24,1888.09 ; v1@5791.81,1273.43 ccw(c5775.59,1289.64) 5798.52,1289.64 ccw(c5821.46,1289.64) v1@5805.24,1273.43 ; v1@5794.64,1270.6 ccw(c5785.25,1279.99) 5798.52,1279.99 ccw(c5811.8,1279.99) v1@5802.41,1270.6
  Bottom Layer w4: v1(4348.52,3131.71) 4358.52,3141.71 ; 4367.08,3141.71 ccw(c4367.08,3151.69) R178.1@4374.74,3145.29 ; 4367.4,3141.71 cw(c4367.4,3131.79) R178.1@4374.83,3138.35 ; R178.1@4371.67,3147.85 cw(c4358.53,3158.84) 4358.53,3141.71 ; R178.1@4371.83,3135.71 ccw(c4358.53,3123.95) 4358.53,3141.71 ; R178.1@4378.82,3141.71 4358.52,3141.71
NetLED21_1: LED21.1 R179.1 | length 5944.2
  Top Layer w4: v1@4150.14,3051.66 cw(c4133.92,3035.44) 4156.86,3035.44 cw(c4179.79,3035.44) v1@4163.57,3051.66 ; v1@4152.97,3054.49 cw(c4143.58,3045.1) 4156.86,3045.1 cw(c4170.14,3045.1) v1@4160.75,3054.49 ; v1(4156.86,3058.37) 4156.86,2916.71 4382.19,2691.37 4382.19,1267.19 4340.04,1225.04 v1(4290.19,1225.04) ; v1@4294.08,1221.15 cw(c4303.47,1211.76) 4303.47,1225.04 cw(c4303.47,1238.32) v1@4294.08,1228.93 ; v1@4296.91,1218.32 cw(c4313.13,1202.11) 4313.13,1225.04 cw(c4313.13,1247.98) v1@4296.91,1231.76 ; v1@6069.86,702.54 cw(c6069.86,679.61) 6086.07,695.82 cw(c6102.29,712.04) v1@6079.36,712.04 ; v1@6069.86,706.54 cw(c6069.86,693.26) 6079.25,702.65 cw(c6088.64,712.04) v1@6075.36,712.04 ; v1(6069.86,712.04) 6148.52,633.37 6148.52,595 6138.48,584.95 6138.48,348.33 LED21.1@6138.48,321.33 ; LED21.1@6133.45,333.98 ccw(c6121.31,346.12) 6138.48,346.12 ; 6138.48,345.25 ccw(c6154.42,345.25) LED21.1@6143.15,333.98
  MidLayer1 w4: v1(4156.86,3058.37) 4290.19,3191.71 4290.19,3231.37 v1(4294.19,3235.37) ; v1@4156.86,3063.87 ccw(c4156.86,3077.15) 4166.25,3067.76 ccw(c4175.64,3058.37) v1@4162.36,3058.37 ; v1@4156.86,3067.87 ccw(c4156.86,3090.81) 4173.07,3074.59 ccw(c4189.29,3058.37) v1@4166.36,3058.37 ; v1@4287.47,3228.66 cw(c4280.91,3222.1) 4290.19,3222.1 cw(c4307.47,3222.1) v1@4295.25,3234.31 ; 4290.19,3202.78 cw(c4326.78,3202.78) v1@4300.91,3228.66 ; 4290.19,3212.44 cw(c4317.13,3212.44) v1@4298.08,3231.49
  MidLayer2 w4: v1@4290.19,1215.54 cw(c4290.19,1192.61) 4306.41,1208.82 cw(c4322.63,1225.04) v1@4299.69,1225.04 ; v1@4290.19,1219.54 cw(c4290.19,1206.26) 4299.58,1215.65 cw(c4308.97,1225.04) v1@4295.69,1225.04 ; v1(4290.19,1225.04) 4406.86,1108.37 4801.5,1108.37 4810.5,1099.37 5274.19,1099.37 5298.52,1075.04 5298.52,875.04 5322.69,850.87 6038,850.87 6069.86,819.02 v1(6069.86,712.04) ; v1@6063.14,718.76 ccw(c6046.92,734.98) 6069.86,734.98 ccw(c6092.79,734.98) v1@6076.57,718.76 ; v1@6065.97,715.93 ccw(c6056.58,725.32) 6069.86,725.32 ccw(c6083.14,725.32) v1@6073.75,715.93
  Bottom Layer w4: v1@4284.69,3235.37 ccw(c4261.76,3235.37) 4277.97,3251.59 ccw(c4294.19,3267.81) v1@4294.19,3244.87 ; v1@4288.69,3235.37 ccw(c4275.41,3235.37) 4284.8,3244.76 ccw(c4294.19,3254.15) v1@4294.19,3240.87 ; v1(4294.19,3235.37) 4271.19,3258.37 4190.19,3258.37 4172.86,3275.71 4172.86,3447.41 4192.15,3466.71 4215,3466.71 4230,3451.71 4230,3400 4260.63,3369.37 R179.1@4378.82,3369.38 ; R179.1@4371.53,3363.57 ccw(c4359.5,3354.01) 4359.5,3369.37 ccw(c4359.5,3384.74) R179.1@4371.52,3375.18
NetLED21_3: LED21.3 R180.1 | length 5003.8
  Top Layer w4: v1@4339.02,3225.04 cw(c4316.09,3225.04) 4332.31,3208.82 cw(c4348.52,3192.61) v1@4348.52,3215.54 ; v1@4343.02,3225.04 cw(c4329.75,3225.04) 4339.13,3215.65 cw(c4348.52,3206.26) v1@4348.52,3219.54 ; v1(4348.52,3225.04) 4315.19,3191.71 4315.19,2781 4398.52,2697.67 4398.52,1678.02 4518.17,1558.37 v1(4576.52,1558.37) ; v1@4569.81,1551.66 ccw(c4553.59,1535.44) 4553.59,1558.37 ccw(c4553.59,1581.31) v1@4569.81,1565.09 ; v1@4572.64,1554.49 ccw(c4563.25,1545.1) 4563.25,1558.37 ccw(c4563.25,1571.65) v1@4572.64,1562.26 ; LED21.3@6106.25,230.58 ccw(c6094.54,242.29) 6111.1,242.29 ccw(c6127.65,242.29) LED21.3@6115.95,230.58 ; LED21.3@6111.1,220.81 6111.1,265 6061,315.1 6061,340 6061,362.56 6048,375.56 6048,534.52 6071.35,557.87 v1(6123.52,610.04) ; v1@6114.02,610.04 cw(c6091.09,610.04) 6107.31,593.82 cw(c6123.52,577.61) v1@6123.52,600.54 ; v1@6118.02,610.04 cw(c6104.75,610.04) 6114.14,600.65 cw(c6123.52,591.26) v1@6123.52,604.54
  MidLayer2 w4: v1(4576.52,1558.37) 4917.56,1558.37 5214.69,1261.25 5214.69,1206.15 5230.84,1190 5566.06,1190 5597.35,1221.29 5673.69,1221.29 5710.76,1184.21 5907.95,1184.21 5932.94,1209.21 6025.79,1209.21 6097.36,1137.64 6097.36,1000.6 6115.87,982.09 6145.26,952.7 6145.26,631.77 v1(6123.52,610.04) ; v1@4580.41,1554.49 cw(c4589.8,1545.1) 4589.8,1558.37 cw(c4589.8,1571.65) v1@4580.41,1562.26 ; v1@4583.24,1551.66 cw(c4599.46,1535.44) 4599.46,1558.37 cw(c4599.46,1581.31) v1@4583.24,1565.09 ; v1@6123.52,615.54 ccw(c6123.52,628.82) 6132.91,619.43 ccw(c6142.3,610.04) v1@6129.02,610.04 ; v1@6123.52,619.54 ccw(c6123.52,642.48) 6139.74,626.26 ccw(c6155.96,610.04) v1@6133.02,610.04
  Bottom Layer w4: v1@4343.68,3233.22 ccw(c4338.65,3241.71) 4348.52,3241.71 ; v1(4348.52,3225.04) 4348.52,3241.71 ; v1@4353.36,3233.22 cw(c4358.39,3241.71) 4348.52,3241.71 ; R180.1@4370.81,3250.86 ccw(c4362.44,3245.89) 4362.44,3255.62 ; R180.1@4370.81,3260.39 cw(c4362.44,3265.36) 4362.44,3255.62 ; R180.1@4378.82,3255.62 4362.44,3255.62 ; 4348.52,3241.71 4362.44,3255.62
NetLED21_4: LED21.4 R181.1 | length 5109.8
  Top Layer w4: v1@4200.14,3293.99 cw(c4183.92,3277.77) 4206.86,3277.77 cw(c4229.79,3277.77) v1@4213.57,3293.99 ; v1@4202.97,3296.82 cw(c4193.58,3287.43) 4206.86,3287.43 cw(c4220.14,3287.43) v1@4210.75,3296.82 ; v1(4206.86,3300.71) 4206.86,2878.02 4390.19,2694.69 4390.19,1675.04 4556.86,1508.37 v1(4556.86,1228.71) ; v1@4550.14,1235.43 ccw(c4533.92,1251.64) 4556.86,1251.64 ccw(c4579.79,1251.64) v1@4563.57,1235.43 ; v1@4552.97,1232.6 ccw(c4543.58,1241.99) 4556.86,1241.99 ccw(c4570.14,1241.99) v1@4560.75,1232.6 ; v1@6084.29,517.6 cw(c6074.59,505.38) 6090.19,505.38 ; v1(6090.19,525.04) 6090.19,505.37 ; v1@6096.1,517.6 ccw(c6105.79,505.38) 6090.19,505.38 ; LED21.4@6106.35,333.98 ccw(c6095.31,345.01) 6110.92,345.01 ; LED21.4@6110.92,321.33 6110.92,484.65 6090.19,505.37 ; 6110.92,346.36 ccw(c6128.43,346.36) LED21.4@6116.05,333.98
  MidLayer2 w4: v1@4556.86,1219.21 cw(c4556.86,1196.27) 4573.07,1212.49 cw(c4589.29,1228.71) v1@4566.36,1228.71 ; v1@4556.86,1223.21 cw(c4556.86,1209.93) 4566.25,1219.32 cw(c4575.64,1228.71) v1@4562.36,1228.71 ; v1(4556.86,1228.71) 4668.86,1116.71 4804.48,1116.71 4813.82,1107.37 5278.86,1107.37 5306.52,1079.71 5306.52,878.48 5326.13,858.87 6041.32,858.87 6090.19,810 v1(6090.19,525.04) ; v1@6083.47,531.76 ccw(c6067.26,547.98) 6090.19,547.98 ccw(c6113.13,547.98) v1@6096.91,531.76 ; v1@6086.3,528.93 ccw(c6076.91,538.32) 6090.19,538.32 ccw(c6103.47,538.32) v1@6094.08,528.93
  Bottom Layer w4: v1(4206.86,3300.71) 4278.21,3300.71 4290,3312.5 R181.1@4378.82,3312.5 ; v1@4210.75,3296.82 cw(c4220.14,3287.43) 4220.14,3300.71 cw(c4220.14,3313.99) v1@4210.75,3304.6 ; v1@4213.57,3293.99 cw(c4229.79,3277.77) 4229.79,3300.71 cw(c4229.79,3323.64) v1@4213.57,3307.43 ; R181.1@4372.23,3305.91 ccw(c4356.32,3290) 4356.32,3312.5 ccw(c4356.32,3335) R181.1@4372.23,3319.09 ; R181.1@4375.06,3308.74 ccw(c4365.98,3299.66) 4365.98,3312.5 ccw(c4365.98,3325.34) R181.1@4375.06,3316.26
NetLED22_1: LED22.1 R182.1 | length 5774.6
  Top Layer w4: v1@4240.19,2715.54 cw(c4240.19,2692.61) 4256.41,2708.82 cw(c4272.63,2725.04) v1@4249.69,2725.04 ; v1@4240.19,2719.54 cw(c4240.19,2706.26) 4249.58,2715.65 cw(c4258.97,2725.04) v1@4245.69,2725.04 ; v1(4240.19,2725.04) 4298.52,2666.71 4298.52,1967.47 4329.46,1936.54 4329.46,1908.79 4320,1899.33 v1(4320,1285) ; v1@4313.28,1291.72 ccw(c4297.06,1307.93) 4320,1307.93 ccw(c4342.93,1307.93) v1@4326.72,1291.72 ; v1@4316.11,1288.89 ccw(c4306.72,1298.28) 4320,1298.28 ccw(c4333.28,1298.28) v1@4323.89,1288.89 ; v1@6241.81,509.99 cw(c6225.59,493.77) 6248.52,493.77 cw(c6271.46,493.77) v1@6255.24,509.99 ; v1@6244.64,512.82 cw(c6235.25,503.43) 6248.52,503.43 cw(c6261.8,503.43) v1@6252.41,512.82 ; LED22.1@6244.69,333.98 ccw(c6235.45,343.23) 6248.52,343.23 ; 6248.52,338.49 ccw(c6258.9,338.49) LED22.1@6251.56,331.15 ; 6248.52,348.15 ccw(c6268.56,348.15) LED22.1@6254.39,333.98 ; v1(6248.52,516.71) 6248.52,322.52 LED22.1@6249.72,321.33
  MidLayer1 w4: v1@4233.47,2731.76 ccw(c4217.26,2747.98) 4240.19,2747.98 ccw(c4263.13,2747.98) v1@4246.91,2731.76 ; v1@4236.3,2728.93 ccw(c4226.91,2738.32) 4240.19,2738.32 ccw(c4253.47,2738.32) v1@4244.08,2728.93 ; v1(4240.19,2725.04) 4240.19,2968.73 4381.86,3110.39 4381.86,3341.71 4344.52,3379.04 4344.52,3549.71 v1(4373.52,3578.71) ; v1@4364.02,3578.71 cw(c4341.09,3578.71) 4357.31,3562.49 cw(c4373.52,3546.27) v1@4373.52,3569.21 ; v1@4368.02,3578.71 cw(c4354.75,3578.71) 4364.14,3569.32 cw(c4373.52,3559.93) v1@4373.52,3573.21
  MidLayer2 w4: v1@4320,1275.5 cw(c4320,1252.56) 4336.22,1268.78 cw(c4352.43,1285) v1@4329.5,1285 ; v1@4320,1279.5 cw(c4320,1266.22) 4329.39,1275.61 cw(c4338.78,1285) v1@4325.5,1285 ; v1(4320,1285) 4338.63,1266.37 4885.17,1266.37 4984.84,1166.71 5230,1166.71 5245.29,1182 5569.37,1182 5600.66,1213.29 5670.38,1213.29 5707.45,1176.21 5911.26,1176.21 5935.05,1200 6023.69,1200 6089.36,1134.33 6089.36,997.29 6098.52,988.12 6098.52,545.71 6127.52,516.71 v1(6248.52,516.71) ; v1@6241.81,509.99 ccw(c6225.59,493.77) 6225.59,516.71 ccw(c6225.59,539.64) v1@6241.81,523.43 ; v1@6244.64,512.82 ccw(c6235.25,503.43) 6235.25,516.71 ccw(c6235.25,529.99) v1@6244.64,520.6
  Bottom Layer w4: v1@4368.98,3570.37 cw(c4364.8,3562.71) 4373.52,3562.71 ; v1(4373.52,3578.71) 4373.52,3562.71 ; R182.1@4373.84,3548.37 ccw(c4368.12,3557.41) 4378.82,3557.41 ; v1@4378.07,3570.37 ccw(c4382.25,3562.71) 4373.52,3562.71 ; R182.1@4378.82,3540 4378.82,3557.41 ; R182.1@4383.8,3548.37 cw(c4389.52,3557.41) 4378.82,3557.41 ; 4373.52,3562.71 4378.82,3557.41
NetLED22_3: LED22.3 R183.1 | length 6073.1
  Top Layer w4: v1(6190.19,207.37) 6203.62,220.81 LED22.3@6222.34,220.81 ; LED22.3@6217.49,215.96 ccw(c6205.79,204.25) 6205.79,220.81 ccw(c6205.79,237.36) LED22.3@6217.49,225.66 ; LED22.3@6220.81,222.34 LED22.3@6222.16,223.69
  MidLayer1 w4: 4273.86,1549.92 4273.86,1318.86 4270,1315 4270,890 4230,850 4148.31,850 4085,786.69 4085,240 4135,190 4785,190 4850,255 5048.69,255 5203.69,100 5610,100 5737,227 6170.56,227 v1(6190.19,207.37) ; 4274,1550.06 4274,1574.82 4256.02,1592.79 4256.02,1737.33 4311.52,1792.83 4326.5,1807.81 4326.5,1842.19 4260,1908.69 4260,2089.94 4198.52,2151.42 4198.52,2483.37 4406.86,2691.71 4406.86,3075 ; v1@4375.14,3391.66 cw(c4358.92,3375.44) 4381.86,3375.44 cw(c4404.79,3375.44) v1@4388.57,3391.66 ; v1@4377.97,3394.49 cw(c4368.58,3385.1) 4381.86,3385.1 cw(c4395.14,3385.1) v1@4385.75,3394.49 ; v1(4381.86,3398.37) 4381.86,3365.35 4398.52,3348.69 4398.52,3106.48 4406.86,3098.14 4406.86,3075 ; 4406.86,3085 4406.86,3075 ; v1@6180.69,207.37 ccw(c6157.76,207.37) 6173.97,223.59 ccw(c6190.19,239.81) v1@6190.19,216.87 ; v1@6184.69,207.37 ccw(c6171.41,207.37) 6180.8,216.76 ccw(c6190.19,226.15) v1@6190.19,212.87
  Bottom Layer w4: R183.1@4372.62,3418.8 cw(c4354.29,3398.21) v1@4381.86,3398.21 ; v1@4375.14,3405.09 ccw(c4358.92,3421.31) 4381.86,3421.31 ccw(c4404.79,3421.31) v1@4388.57,3405.09 ; R183.1@4375.28,3421.79 cw(c4362.23,3407.13) v1@4381.86,3407.13 ; v1@4377.97,3402.26 ccw(c4368.58,3411.65) 4381.86,3411.65 ccw(c4395.14,3411.65) v1@4385.75,3402.26 ; R183.1@4378.82,3425.04 R183.1@4378.82,3426.25 ; R183.1@4378.86,3425.04 4381.86,3422.04 v1(4381.86,3398.37) ; 4381.86,3410.6 cw(c4393.98,3410.6) R183.1@4385.41,3419.17
NetLED22_4: LED22.4 R184.1 | length 5213.2
  Top Layer w4: v1@4373.52,3445.54 cw(c4373.52,3422.61) 4389.74,3438.82 cw(c4405.96,3455.04) v1@4383.02,3455.04 ; v1@4373.52,3449.54 cw(c4373.52,3436.26) 4382.91,3445.65 cw(c4392.3,3455.04) v1@4379.02,3455.04 ; v1(4373.52,3455.04) 4415.19,3413.37 4415.19,3388.73 4398.52,3372.06 4398.52,3158.37 4491.19,3065.71 4491.19,2771.19 4455,2735 4455,2636.86 4465.86,2626 4465.86,2139 4456.86,2130 v1(4456.86,1925.04) ; v1@4450.14,1931.76 ccw(c4433.92,1947.98) 4456.86,1947.98 ccw(c4479.79,1947.98) v1@4463.57,1931.76 ; v1@4452.97,1928.93 ccw(c4443.58,1938.32) 4456.86,1938.32 ccw(c4470.14,1938.32) v1@4460.75,1928.93 ; v1@5989.02,1475.04 cw(c5966.09,1475.04) 5982.31,1458.82 cw(c5998.52,1442.61) v1@5998.52,1465.54 ; v1@5993.02,1475.04 cw(c5979.75,1475.04) 5989.14,1465.65 cw(c5998.52,1456.26) v1@5998.52,1469.54 ; v1(5998.52,1475.04) 5973.52,1450.04 5881.86,1450.04 5873.52,1441.71 5873.52,1400.04 6040.19,1233.37 6040.19,898.68 6222.16,716.71 LED22.4@6222.16,321.33 ; LED22.4@6217.59,333.98 ccw(c6206.56,345.01) 6222.16,345.01 ; 6222.16,346.36 ccw(c6239.67,346.36) LED22.4@6227.29,333.98
  MidLayer2 w4: v1(4456.86,1925.04) 4473.86,1942.04 4674.98,1942.04 4687.83,1929.19 4736.04,1929.19 4740.19,1925.04 5006.86,1658.37 5398.52,1658.37 5565.19,1491.71 5981.86,1491.71 v1(5998.52,1475.04) ; v1@4456.86,1930.54 ccw(c4456.86,1943.82) 4466.25,1934.43 ccw(c4475.64,1925.04) v1@4462.36,1925.04 ; v1@4456.86,1934.54 ccw(c4456.86,1957.48) 4473.07,1941.26 ccw(c4489.29,1925.04) v1@4466.36,1925.04 ; v1@5989.02,1475.04 ccw(c5966.09,1475.04) 5982.31,1491.26 ccw(c5998.52,1507.48) v1@5998.52,1484.54 ; v1@5993.02,1475.04 ccw(c5979.75,1475.04) 5989.14,1484.43 ccw(c5998.52,1493.82) v1@5998.52,1480.54
  Bottom Layer w4: v1@4368.15,3462.88 ccw(c4354.27,3483.12) 4378.82,3483.12 v1@4378.82,3460.34 ; v1@4370.41,3459.58 ccw(c4359.48,3475.53) R184.1@4378.82,3475.53 ; R184.1@4372.27,3476 cw(c4356.81,3460.34) v1@4378.82,3460.34 ; v1@4372.68,3456.28 ccw(c4364.68,3467.94) 4378.82,3467.94 ; v1(4373.52,3455.04) v1@4378.82,3460.34 ; R184.1@4375.08,3478.85 cw(c4366.26,3469.91) 4378.82,3469.91 cw(c4391.38,3469.91) R184.1@4382.56,3478.85 ; R184.1@4385.37,3476 ccw(c4400.83,3460.34) v1@4378.82,3460.34